# Altium PCB ePBR25_ACU_Power_rev0.PcbDoc (part 1 of 5)
Units mil, origin at the board's own origin, x right, y up, seen from the top; angles counter-clockwise.
Board outline 8211 x 3959 mil, 2 copper layers (Top Layer, Bottom Layer); 145 components, 129 nets, 544 pads, 1610 vias.
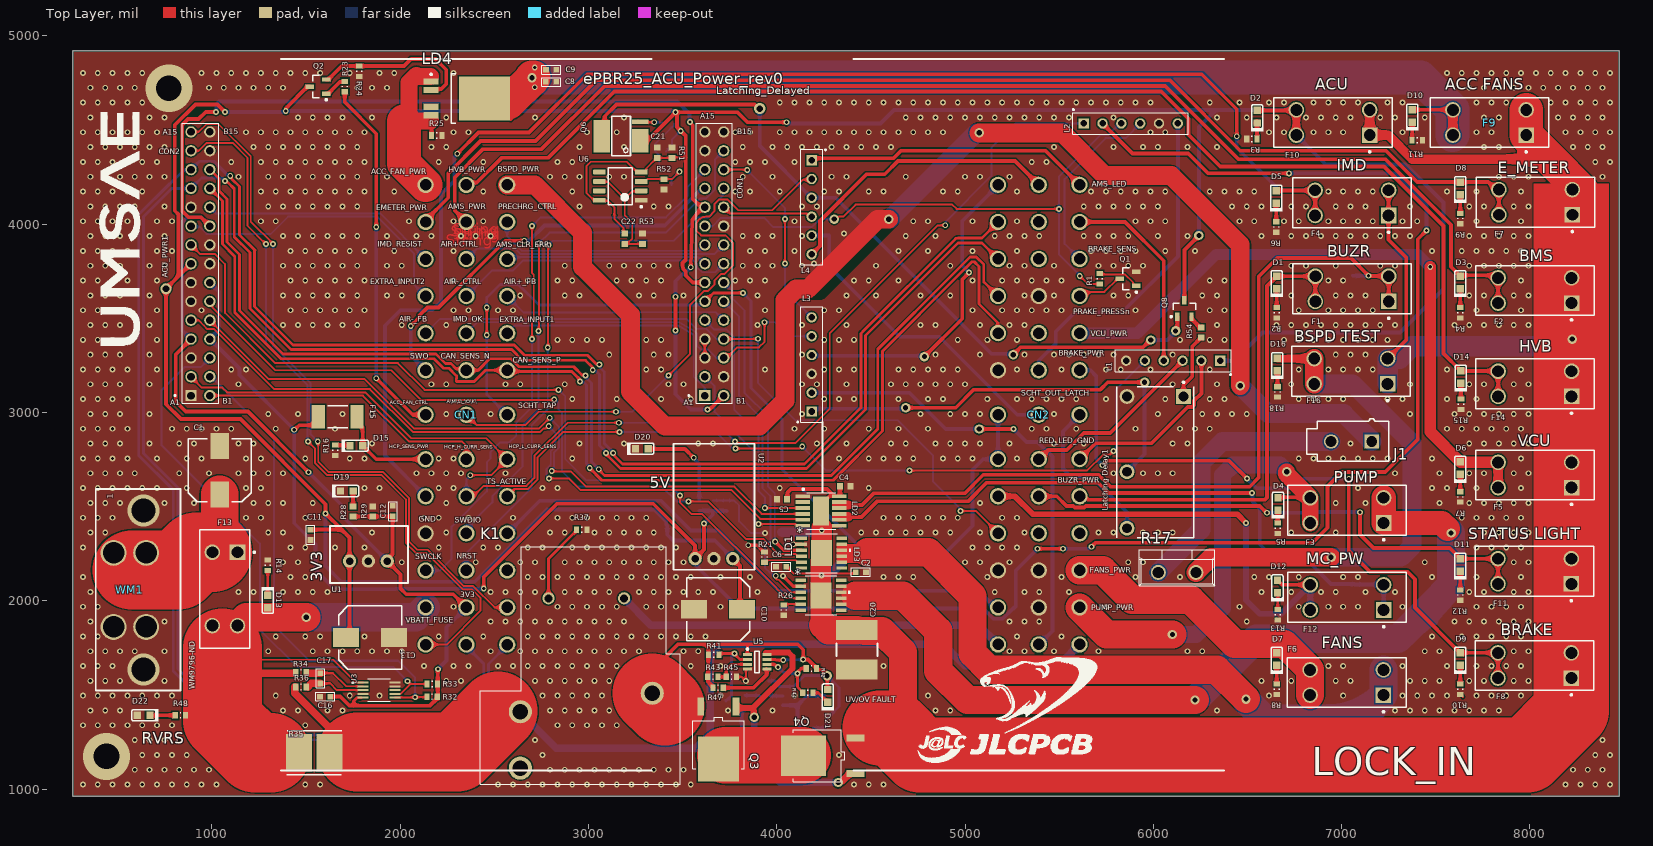
[diagram p0: Top Layer view]
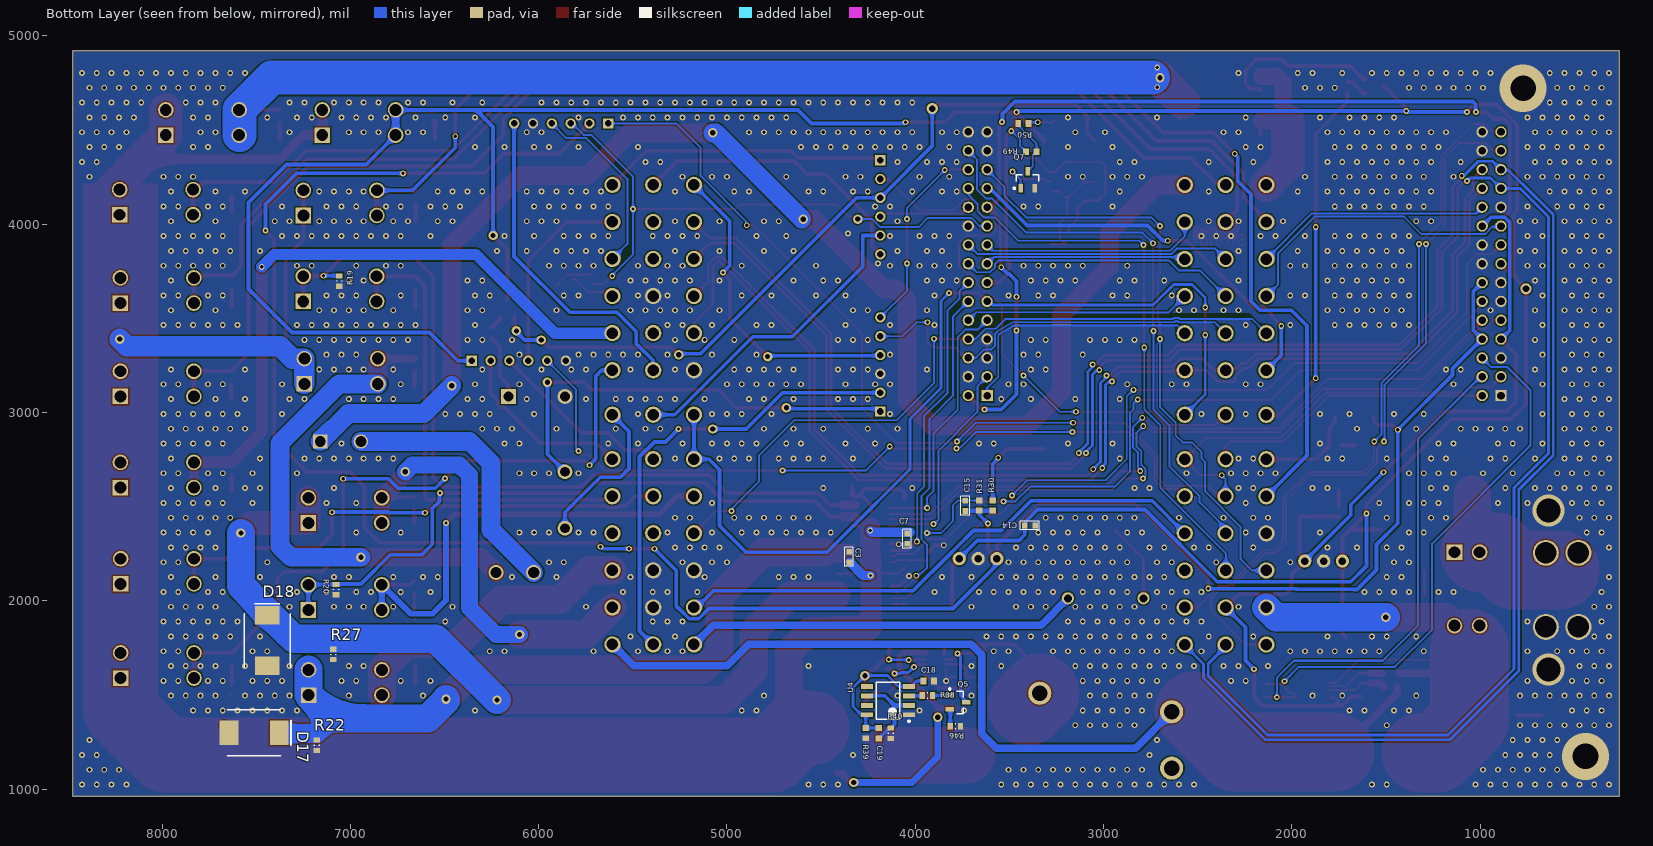
[diagram p1: Bottom Layer view, seen from below]

## Layer stack, top to bottom
Top Solder: solder mask 0.4, Solder Resist, Dk 3.5
Top Layer: signal copper 2.8
Dielectric 1: dielectric 12.6, FR-4, Dk 4.8
Bottom Layer: signal copper 2.8
Bottom Solder: solder mask 0.4, Solder Resist, Dk 3.5

## Board outline
262,961 8473,961 8473,4920 262,4920

## Design rules (kind name [scope] priority, off if disabled: settings)
Clearance "Stitching GND" [IsStitchingVia and InNet('GND') vs (IsVia and (Not IsStitchingVia)) Or IsPad] p1: gap=5 ignorepadtopadclearanceinfootprint=FALSE
Clearance [All] p2: gap=7 ignorepadtopadclearanceinfootprint=TRUE except(0: Arc-Hole Track-Hole SMDPad-Hole THPad-Hole Via-Hole Fill-Hole Poly-Hole Region-Hole Text-Hole)
ComponentClearance [All] p1: gap=0 collisioncheckmode=3 verticalgap=0 showdistances=FALSE
DiffPairsRouting [All] p1: maxlimit=10 minlimit=10 mostfreqgap=10 toplayer_minwidth=15 toplayer_maxwidth=15 toplayer_prefwidth=15 bottomlayer_minwidth=15 bottomlayer_maxwidth=15 bottomlayer_prefwidth=15 maxuncoupledlength=500
HoleSize [All] p1: absolutevalues=TRUE maxlimit=200 minlimit=10 maxpercent=80.000 minpercent=20.000
HoleToHoleClearance [All] p1: gap=8 allowstackedmicrovias=TRUE
MinimumAnnularRing MinimumAnnularRing_Pad [IsPad] p1: minimumring=7
MinimumAnnularRing MinimumAnnularRing_Via [IsVia] p2: minimumring=5
MinimumSolderMaskSliver [All] p1: minsoldermaskwidth=4
PlaneClearance [All] p1: clearance=15
PlaneConnect PlaneConnect_12V [InNet('12V')] p1: planeconnectstyle=Direct reliefexpansion=20 reliefentries=4 reliefconductorwidth=20 reliefairgap=10
PlaneConnect PlaneConnect_1 [All] p2: planeconnectstyle=Relief reliefexpansion=15 reliefentries=4 reliefconductorwidth=15 reliefairgap=10
PolygonConnect [All] p1: connectstyle=Direct reliefconductorwidth=15 reliefentries=4 polygonreliefangle="90 Angle" airgapwidth=10
RoutingVias [All] p1: holewidth=17 width=31 viastyle="Through Hole" minholewidth=15 minwidth=29 maxholewidth=50 maxwidth=100
SilkToSilkClearance [All] p1: silktosilkclearance=7
SilkToSolderMaskClearance [IsPad] p1: minsilkscreentomaskgap=2 clearancetoexposedcopper=TRUE
SolderMaskExpansion [All] p1: expansion=3 istentingtop=FALSE
SupplyNets "Schematic Supply Nets_5" [InNet('GLV')] p1: voltage=0.000
SupplyNets "Schematic Supply Nets_4" [InNet('3V3')] p2: voltage=0.000
SupplyNets "Schematic Supply Nets_3" [InNet('GND')] p3: voltage=0.000
SupplyNets "Schematic Supply Nets_2" [InNet('VS')] p4: voltage=0.000
SupplyNets "Schematic Supply Nets_1" [InNet('ACU_PWR')] p5: voltage=0.000
SupplyNets "Schematic Supply Nets" [InNet('5V')] p6: voltage=0.000
Width [All] p1: maxlimit=420 minlimit=7 preferedwidth=15
21 further rules are at their usual default settings.

## Classes and differential pairs
component class "1  - Connectors": CN1 CN2 CN3 CN4 CON1 CON2 L1 L2 L3 L4 Q1 R1 WM1 WM?
component class Designator: ACU_PWR1 C3 D1 D2 D3 D4 D5 D6 D7 D8 D9 D10 D11 D12 D13 D14 D15 D16 F1 F2 F3 F4 F5 F6 F7 F8 F9 F10 F11 F12 F13 F14 F15 F16 J1 R2 R3 R4 R5 R6 R7 R8 R9 R10 R11 R12 R13 R14 R15 R16 R17 R18
differential pair CAN: +CAN_P -CAN_N
differential pair CAN_SENS: +CAN_SENS_P -CAN_SENS_N

## Components (designator, comment, footprint, x,y, rotation, side; value= is the part's Value field where it differs from the comment)
ACU_PWR1 "Test Via" "Test Via" 756,3657 r270 top
C1 "UUD1H101MNL1GS" NIC-CAPA2-8X10_V 1041,2693 r90 top
C2 "Cap" 0603R-generic 4474,2152 r180 top value=10uF
C3 "Cap" 0603R-generic 4350.9,2260.49 r270 bottom value=10uF
C4 "Cap Semi" 1608[0603] 4363,2608 r180 top value=10uF
C5 "Cap Semi" 1608[0603] 4027.5,2540.06 r0 top value=10uF
C6 "Cap" 0603R-generic 3995.5,2180.68 r0 top value=10uF
C7 "Cap" 0603R-generic 4043,2302 r90 bottom value=10uF
C8 "Cap" 0603R-generic 2828.4,4756.01 r180 top value=10uF
C9 "Cap" 0603R-generic 2828.9,4820.51 r180 top value=10uF
C10 "UUD1H101MNL1GS" NIC-CAPA2-8X10_V 3688,1955 r180 top
C11 "Cap" 0603R-generic 1523.7,2322.84 r90 top value=10uF
C12 "Cap" 0603R-generic 1961,2504 r270 top value=10uF
C13 "UUD1H101MNL1GS" NIC-CAPA2-8X10_V 1840,1805 r0 top
C14 "Cap" 0603R-generic 3363,2400 r0 bottom value=10uF
C15 "Cap" 0603R-generic 3734,2532 r270 bottom value=10uF
C16 "Cap" 0603R-generic 1628.68,1491 r180 top value=0.1uF
C17 "Cap" 0603R-generic 1576,1561 r90 top value=0.1uF
C18 "Cap Semi" 1608[0603] 3927.58,1574.35 r0 bottom value=10uF
C19 "Cap Semi" 1608[0603] 4194,1297 r90 bottom value=10uF
C20 "Cap Semi" "2J-Lead 6.1 x 5.3" 4424,1737.29 r270 top value=33uF
C21 "Cap Semi" 1608[0603] 3365.21,4379.85 r270 top value=10uF
C22 "Cap Semi" 1608[0603] 3192,3923 r90 top value=15uF
CN1 "5-1418363-1" "LeavySeal 39 pin Ver" 2351.54,2988 r90 top
CN2 "5-1418363-1" "LeavySeal 39 pin Ver" 5391.46,2988.38 r90 top
CON1 "6-534998-3" *TE_6-146257-5 3719,3690 r90 top
CON2 "6-534998-3" *TE_6-146257-5 989.98,3690 r90 top
D1 "KP-1608MGC" KING-0603LED_GREEN_V 6655,3690 r90 top
D2 "KP-1608MGC" KING-0603LED_GREEN_V 6551,4571 r90 top
D3 "KP-1608MGC" KING-0603LED_GREEN_V 7630,3690 r90 top
D4 "KP-1608MGC" KING-0603LED_GREEN_V 6662,2514.5 r90 top
D5 "KP-1608MGC" KING-0603LED_GREEN_V 6652,4145 r90 top
D6 "KP-1608MGC" KING-0603LED_GREEN_V 7630,2704.47 r90 top
D7 "KP-1608MGC" KING-0603LED_GREEN_V 6655,1690 r90 top
D8 "KP-1608MGC" KING-0603LED_GREEN_V 7630,4190 r90 top
D9 "KP-1608MGC" KING-0603LED_GREEN_V 7630,1690 r90 top
D10 "KP-1608MGC" KING-0603LED_GREEN_V 7374.9,4574.77 r90 top
D11 "KP-1608MGC" KING-0603LED_GREEN_V 7630,2190 r90 top
D12 "KP-1608MGC" KING-0603LED_GREEN_V 6659,2075 r90 top
D13 "KP-1608MGC" KING-0603LED_GREEN_V 1297,1996 r270 top
D14 "KP-1608MGC" KING-0603LED_GREEN_V 7632,3188 r90 top
D15 "KP-1608MGC" KING-0603LED_GREEN_V 1767,2824.09 r0 top
D16 "KP-1608MGC" KING-0603LED_GREEN_V 6658,3254.93 r90 top
D17 "S8MC-13" S8MC-13 7511,1299 r180 bottom
D18 "S8MC-13" S8MC-13 7441,1789 r90 bottom
D19 "KP-1608MGC" KING-0603LED_GREEN_V 1716.47,2583 r0 top
D20 "KP-1608MGC" KING-0603LED_GREEN_V 3283,2808 r0 top
D21 "UVOV FAULT" TOSH-0603LED_RED_V 4270.9,1495.16 r90 top
D22 "RVRS POLARITY" TOSH-0603LED_RED_V 637.77,1391.5 r180 top
F1 "36-3568-ND" KSTN-3568_V 7055,3656.53 r180 top
F2 "36-3568-ND" KSTN-3568_V 8025.88,3647.93 r180 top
F3 "36-3568-ND" KSTN-3568_V 7028,2480 r180 top
F4 "36-3568-ND" KSTN-3568_V 7054,4113 r180 top
F5 "36-3568-ND" KSTN-3568_V 8026,2668 r180 top
F6 "36-3568-ND" KSTN-3568_V 7027,1566.22 r180 top
F7 "36-3568-ND" KSTN-3568_V 8030,4116.93 r180 top
F8 "36-3568-ND" KSTN-3568_V 8025,1656.54 r180 top
F9 "36-3568-ND" KSTN-3568_V 7785.12,4539.93 r180 top
F10 "36-3568-ND" KSTN-3568_V 6954,4540 r180 top
F11 "36-3568-ND" KSTN-3568_V 8025,2156.53 r180 top
F12 "36-3568-ND" KSTN-3568_V 7028,2017.93 r180 top
F13 "36-3568-ND" KSTN-3568_V 1069.07,2062.88 r270 top
F14 "36-3568-ND" KSTN-3568_V 8026,3152 r180 top
F15 "1812L050PR" LFUS-1812L050_V 1667.4,2977.95 r0 top
F16 "36-3568-ND" KSTN-3568_V 7049,3219 r180 top
J1 "39-28-1023" MOLX-39-28-1023-2_V 7052,2846 r270 top
K1 "J115F11C12VDCSH.9" RELAY_J115F11C12VDCSH.9 2956.74,1655.72 r180 top
L1 "6 Pin Header" 5-146285-6 6155,3275 r180 top
L2 "6 Pin Header" 5-146285-6 5830,4535 r0 top
L3 "6 Pin Header" 5-146285-6 4185,3205 r90 top
L4 "6 Pin Header" 5-146285-6 4185,4140 r270 top
"Latching Delay1" "ALQ3F12" FP-ALQ3F12-MFG 6010,2735 r270 top
LD1 "VN5E050AJTR-E" SO_050AJ-E_STM 4237.75,2252.74 r0 top
LD2 "LD - VND5E050JTR-E" VND5E050JTR-E 4235,2477 r0 top
LD3 "VN5E050AJTR-E" SO_050AJ-E_STM 4234.75,2029.24 r0 top
LD4 "BTS6142D" INF-PG-TO252-5-11_M 2353,4668 r0 top
Q1 "" SOT-23_N 5865,3710 r180 top
Q2 "" SOT-23_N 1563,4731 r180 top
Q3 "MCU80N03A-TP" MCU80N_MCE 3690,1235 r180 top
Q4 "MCU80N03A-TP" MCU80N_MCE 4215.14,1176.95 r90 top
Q5 "" SOT-23_N 3772,1460.38 r180 bottom
Q6 "FDS6675" SO08-E3 3173,4468 r90 top
Q7 "" SOT-23_N 3403,4235.71 r90 bottom
Q8 "" SOT-23_N 6164.92,3552.85 r90 top
R1 "1k" RESC0603(1608)_L 5715,3710 r90 top
R2 "560" RESC0603(1608)_L 6655,3530 r270 top
R3 "560" RESC0603(1608)_L 6523,4452 r180 top
R4 "560" RESC0603(1608)_L 7630,3530 r270 top
R5 "560" RESC0603(1608)_L 6660,2385 r270 top
R6 "560" RESC0603(1608)_L 6652,3985 r270 top
R7 "560" RESC0603(1608)_L 7630,2551.63 r270 top
R8 "560" RESC0603(1608)_L 6655,1530 r270 top
R9 "560" RESC0603(1608)_L 7630,4030 r270 top
R10 "560" RESC0603(1608)_L 7630,1530 r270 top
R11 "560" RESC0603(1608)_L 7401,4445 r0 top
R12 "560" RESC0603(1608)_L 7630,2030 r270 top
R13 "560" RESC0603(1608)_L 6661,1926 r270 top
R14 "560" RESC0603(1608)_L 1295.77,2188.79 r90 top
R15 "560" RESC0603(1608)_L 7634,3044 r270 top
R16 "560" RESC0603(1608)_L 1654.38,2798.96 r270 top
R17 "5.6R" TO220AC 6025.99,2150.41 r0 top
R18 "560" RESC0603(1608)_L 6659,3109 r270 top
R19 "10K" RESC0603(1608)_L 7058,3698 r270 bottom
R20 "10K" RESC0603(1608)_L 7075.87,2059.53 r270 bottom
R21 "10K" RESC0603(1608)_L 3935,2232 r270 top
R22 "10K" RESC0603(1608)_L 7179,1232.44 r90 bottom
R23 "1K" RESC0603(1608)_L 1706,4731 r90 top
R24 "10K" RESC0603(1608)_L 1783,4812 r270 top
R25 "10K" RESC0603(1608)_L 2193.97,4471 r0 top
R26 "10K" RESC0603(1608)_L 4037,1950.5 r90 top
R27 "10K" RESC0603(1608)_L 7090,1715 r90 bottom
R28 "Res1" 1608[0603] 1749,2474 r90 top value=82R
R29 "Res1" 1608[0603] 1855,2474 r270 top value=100
R30 "Res1" 1608[0603] 3589,2506 r90 bottom value=180R
R31 "Res1" 1608[0603] 3660,2506 r270 bottom value=100
R32 "2.2k" RESC0603(1608)_L 2169,1491 r0 top
R33 "2.2k" RESC0603(1608)_L 2170,1558 r0 top
R34 "5" RESC0603(1608)_L 1473,1619 r180 top
R35 "WSHP28182L000FEB" FP-WSHP2818-MFG 1543,1193 r180 top
R36 "5" RESC0603(1608)_L 1473,1542 r180 top
R37 "100" RESC0603(1608)_L 2964.53,2377 r0 top
R38 "10K" RESC0603(1608)_L 3935,1497.11 r180 bottom
R39 "Res1" 1608[0603] 4262.25,1297.39 r90 bottom value=10K
R40 "1000K" RESC0603(1608)_L 4130.5,1296.59 r90 bottom
R41 "21K" RESC0603(1608)_L 3665.27,1713.95 r0 top
R42 "10K" RESC0603(1608)_L 4183.69,1640.71 r180 top
R43 "32K" RESC0603(1608)_L 3660.87,1595.81 r180 top
R44 "560" RESC0603(1608)_L 4164.99,1510.89 r0 top
R45 "1K" RESC0603(1608)_L 3759,1596 r180 top
R46 "1K" RESC0603(1608)_L 3786.56,1332.93 r180 bottom
R47 "510K" RESC0603(1608)_L 3688,1538 r0 top
R48 "560" RESC0603(1608)_L 832.77,1391.5 r180 top
R49 "Res1" 1608[0603] 3383.91,4385.42 r0 bottom value=10K
R50 "Res1" 1608[0603] 3425,4535 r180 bottom value=100
R51 "" 1608[0603] 3443.7,4379.85 r270 top value=10K
R52 "Res1" 1608[0603] 3401,4211 r90 top value=10K
R53 "Res1" 1608[0603] 3286.89,3923 r270 top value=1000K
R54 "Res1" 1608[0603] 6253.57,3424.87 r270 top value=1k
U1 "Volt Reg" DCDC_VERTICAL 1831,2211 r180 top
U2 "Volt Reg" DCDC_HORIZONTAL 3666,2224 r0 top
U3 "INA230" SOP50P490X110-10N 1886.33,1611.71 r0 top
U4 "NE555DR" D0008A_M 4144.19,1469.56 r0 bottom
U5 "LTC4365ITS8#TRMPBF" LT-TS8-8-TSOT-23_V 3895.6,1675.56 r0 top
U6 "NE555DR" D0008A_M 3168.78,4202 r180 top
WM1 "WM9796-ND" WM9796-ND 477.77,2057.85 r90 top

## Footprints (in the part's own frame and the unit in brackets; to place one, negate y for a bottom-side part, rotate by r counter-clockwise, add the part's x,y. Pads: shape width x height; smd on the part's side, far side on the other; paste and mask are expansions set on the pad)
"2J-Lead 6.1 x 5.3" [mm]
  rect 2.7x5.6 smd: 1(-2.7,0) 2(2.6,0)
  silkscreen extent -0.9,-2.7 0.8,2.8, body extent -3.4,-2.8 3.3,2.8, height 5
5-146285-6 [mm] "6-pin Header"
  rect 1.398x1.398 hole 0.89: 1(-5.08,0)
  round 1.398 hole 0.89: 2(-2.54,0) 3(0,0) 4(2.54,0) 5(5.08,0) 6(7.62,0)
  silkscreen extent -6.58,-1.47 9.05,1.97, body extent -6.37,-1.27 8.87,1.27, height 9.5
0603R-generic [mil] "RESISTOR 0603"
  rect 30x30 smd: 1(0,0) 2(55,0)
  silkscreen extent -23,-23 78,23, body extent -4,-15 59,15, height 19
1608[0603] [mm] "Chip Capacitor, Body 1.6x0.8mm, IPC High Density"
  rect 0.8x0.9 smd: 1(-0.7,0) 2(0.7,0)
  body extent -0.87,-0.48 0.87,0.48, height 1.3
*TE_6-146257-5 [mm] "HEADER VERT 30POS"
  rect 1.53x1.53 hole 1.02: A1(-15.24,2.565)
  round 1.53 hole 1.02: A2(-12.7,2.565) A3(-10.16,2.565) A4(-7.62,2.565) A5(-5.08,2.565) A6(-2.54,2.565) A7(0,2.565) A8(2.54,2.565) A9(5.08,2.565) A10(7.62,2.565) A11(10.16,2.565) A12(12.7,2.565) A13(15.24,2.565) A14(17.78,2.565) A15(20.32,2.565) B1(-15.24,0.025) B2(-12.7,0.025) B3(-10.16,0.025) B4(-7.62,0.025) B5(-5.08,0.025) B6(-2.54,0.025) B7(0,0.025) B8(2.54,0.025) B9(5.08,0.025) B10(7.62,0.025) B11(10.16,0.025) B12(12.7,0.025) B13(15.24,0.025) B14(17.78,0.025) B15(20.32,0.025)
  silkscreen extent -16.31,-1.14 21.47,4.83, body extent -16.48,-1.29 21.62,3.79, height 8.67
D0008A_M [mm] "SOIC, 8-Leads, Body 5x4mm, Pitch 1.27mm, IPC Low Density"
  rrect15% 1.65x0.65 smd: 1(-2.825,1.905) 2(-2.825,0.635) 3(-2.825,-0.635) 4(-2.825,-1.905) 5(2.825,-1.905) 6(2.825,-0.635) 7(2.825,0.635) 8(2.825,1.905)
  silkscreen extent -2.95,-2.5 1.6,2.9, body extent -3,-2.45 3,2.45, height 1.63
DCDC_HORIZONTAL [mm]
  round 1.8 hole 1: 1(2.54,0) 2(0,0) 3(-2.54,0)
  silkscreen extent -5.45,-1.5 5.45,15.5, body extent -5.23,-1.29 5.18,15.22, height 7.75
DCDC_VERTICAL [mm]
  round 1.8 hole 1: 1(2.54,0) 2(0,0) 3(-2.54,0)
  silkscreen extent -5.33,-4.75 5.2,2.98, body extent -5.28,-4.87 5.14,2.87, height 17.18
FP-ALQ3F12-MFG [mm]
  rect 2x2 hole 1.3 paste-2539.97 mask+0: 1(-8.89,3.81)
  round 2 hole 1.3 paste-2539.97 mask+0: 2(-8.89,-3.81) 3(1.27,-3.81) 4(8.89,-3.81)
  silkscreen extent -10.92,-5.2 10.2,5.2, body extent -10.3,-5.3 10.3,5.3, height 0.25
FP-WSHP2818-MFG [mm]
  rect 3.5x5.1 smd paste+0 mask+0: 1(-2.055,0) 2(2.055,0)
  silkscreen extent -3.69,-2.94 3.67,2.95, body extent -3.91,-2.65 3.91,2.65, height 0.25
INF-PG-TO252-5-11_M [mm] "DPAK, 5-Leads, Body 6.5x6.12mm, Pitch 1.14mm, IPC Low Density"
  rect 2.05x0.85 smd: 1(-4.8,2.28) 2(-4.8,1.14) 4(-4.8,-1.14) 5(-4.8,-2.28)
  rect 6.9x5.95 smd: 3(2.4,0)
  silkscreen extent -4.92,-3.35 -1.45,3.38, body extent -2.05,-3.32 4.17,3.32, height 2.35
KING-0603LED_GREEN_V [mm] "SMT LED, 2-Leads, Body 1.6x0.8mm (0603-Size)"
  rect 1x1 smd paste+0 mask+0: 1(0.85,0) 2(-0.85,0)
  silkscreen extent -1.97,-0.85 1.6,0.85, body extent -0.92,-0.53 1.09,0.53, height 1.1
KSTN-3568_V [mm] "THD, 4-Leads, Body 16x6.73mm, Pitch 9.9mm"
  rect 2.1x2.1 hole 1.6: 1(-4.95,1.7)
  round 2.1 hole 1.6: 2(-4.95,-1.7) 3(4.95,1.7) 4(4.95,-1.7)
  silkscreen extent -8,-3.36 8,4.09, body extent -8,-3.37 8,3.37, height 7.44
"LeavySeal 39 pin Ver" [mm] "Levyseal 90 degree 39 pin header 5-1418363-3"
  round 2.2 hole 1.55: 1(31,-5.5) 2(31,0) 3(31,5.5) 4(26,-5.5) 5(26,0) 6(26,5.5) 7(21,-5.5) 8(21,0) 9(21,5.5) 10(16,-5.5) 11(16,0) 12(16,5.5) 13(11,-5.5) 14(11,0) 15(11,5.5) 16(6,-5.5) 17(6,0) 18(6,5.5) 19(0,-5.5) 20(0,0) 21(0,5.5) 22(-6,-5.5) 23(-6,0) 24(-6,5.5) 25(-11,-5.5) 26(-11,0) 27(-11,5.5) 28(-16,-5.5) 29(-16,0) 30(-16,5.5) 31(-21,-5.5) 32(-21,0) 33(-21,5.5) 34(-26,-5.5) 35(-26,0) 36(-26,5.5) 37(-31,-5.5) 38(-31,0) 39(-31,5.5)
  silkscreen extent -48,-25 48,25, body extent -66,-24 66,24, height 9.5
LFUS-1812L050_V [mm] "Chip Fuse, 2-Leads, Body 4.73x3.41mm"
  rect 1.78x3.15 smd: 1(-2.615,0) 2(2.615,0)
  silkscreen extent -1.35,-1.47 1.35,1.47, body extent -2.36,-1.7 2.36,1.7, height 0.75
LT-TS8-8-TSOT-23_V [mm] "SOT23, 8-Leads, Body 2.9x1.75mm, Pitch 0.65mm"
  rect 1.22x0.4 smd: 1(-1.31,0.975) 2(-1.31,0.325) 3(-1.31,-0.325) 4(-1.31,-0.975) 5(1.31,-0.975) 6(1.31,-0.325) 7(1.31,0.325) 8(1.31,0.975)
  silkscreen extent -1.43,-1.45 0.3,1.85, body extent -0.87,-1.45 0.88,1.45, height 1
MCU80N_MCE [mil]
  rect 36x95 smd: 1(-94,-202.5) 2(94,-202.5)
  rect 217x239 smd: 3(0,74.5)
  silkscreen extent -137,-147 137,127
MOLX-39-28-1023-2_V [mm] "THD, 2-Leads, Body 11x5.8mm"
  rect 1.95x1.95 hole 1.45: 1(0,2.75)
  round 1.95 hole 1.45: 2(0,-2.75)
  silkscreen extent -3.1,-6 2.7,5, body extent -3.1,-6 2.7,5, height 13.6
NIC-CAPA2-8X10_V [mm] "Aluminum Electrolytic Capacitor, Diameter 8mm, Height 10.8mm, Pitch 6.5mm"
  rect 3.5x2.5 smd: 1(-3.25,0) 2(3.25,0)
  silkscreen extent -4.25,-4.25 4.25,4.25, body extent -3.99,-3.97 3.99,4, height 10.8
RELAY_J115F11C12VDCSH.9 [mm]
  round 1.65 hole 1.1: A1(-5.9,-9.075) A2(4.3,-9.075)
  round 3.116 hole 2.1: COM(-9.7,3.725) NC(8.1,13.825) NO(8.1,6.225)
  silkscreen extent -13.5,-16.02 13.5,16.02, body extent -13.5,-16.03 13.5,16.02, height 20
RESC0603(1608)_L [mm]
  rect 0.7x0.9 smd: 1(-0.7,0) 2(0.7,0)
  silkscreen extent -0.05,-0.35 0.05,0.35, body extent -0.85,-0.47 0.85,0.47, height 0.6
S8MC-13 [mil]
  rect 100x130 smd: 1(-133.86,0) 2(133.86,0)
  silkscreen extent -142,-122 195,122
SO08-E3 [mm]
  rect 3.15x2.2 smd mask+0: 1-3(-0.635,-2.6)
  rect 0.6x2.2 smd: 4(1.905,-2.6)
  rect 4.4x2.2 smd mask+0: 5-8(0,2.6)
  silkscreen extent -2.67,-1.27 2.67,1.27
SO_050AJ-E_STM [mil]
  rect 57.5x18 smd paste+0 mask+0: 1(-107.25,78.74) 2(-107.25,47.24) 3(-107.25,15.75) 4(-107.25,-15.75) 5(-107.25,-47.24) 6(-107.25,-78.74) 7(107.25,-78.74) 8(107.25,-47.24) 9(107.25,-15.75) 10(107.25,15.75) 11(107.25,47.24) 12(107.25,78.74)
  rect 110x138 smd paste-68.5 mask+0: EPAD(0,0)
  silkscreen extent -84,-104 156,104, body extent -122,-99 122,99, height 64
SOP50P490X110-10N [mm]
  rrect25% 1.47x0.28 smd: 1(-2.124,-1.185) 2(-2.124,-1.685) 3(-2.124,-2.185) 4(-2.124,-2.685) 5(-2.124,-3.185) 6(2.176,-3.185) 7(2.176,-2.685) 8(2.176,-2.185) 9(2.176,-1.685) 10(2.176,-1.185)
  silkscreen extent -3.57,-3.69 1.53,-0.69, body extent -2.42,-3.69 2.48,-0.69, height 1.1
SOT-23_N [mm] "SOT23, 3-Leads, Body 2.9x1.3mm, Pitch 0.95mm, Lead Span 2.5mm, IPC Medium Density"
  rect 1.15x0.6 smd: 1(-1.125,0.95) 2(-1.125,-0.95) 3(1.125,0)
  silkscreen extent -1.25,-1.5 0.7,1.92, body extent -0.7,-1.5 0.7,1.5, height 1.1
"Test Via" [mm] "Test Via Hole"
  round 1.5 hole 0.9: 1(0,0)
TO220AC [mil]
  round 80 hole 60: 1(200,0) 2(0,0)
  silkscreen extent -100,-70 300,120, body extent -100,-70 300,120, height 920
TOSH-0603LED_RED_V [mm] "SMT LED, 2-Leads, Body 1.6x0.8mm (0603-Size)"
  rect 1x1 smd paste+0 mask+0: 1(0.85,0) 2(-0.85,0)
  silkscreen extent -1.97,-0.85 1.6,0.85, body extent -0.92,-0.53 1.09,0.53, height 0.6
VND5E050JTR-E [mm]
  rect 1.97x0.5 smd: 1(-2.475,2) 2(-2.475,1.2) 3(-2.475,0.4) 4(-2.475,-0.4) 5(-2.475,-1.2) 6(-2.475,-2) 7(2.475,-2) 8(2.475,-1.2) 9(2.475,-0.4) 10(2.475,0.4) 11(2.475,1.2) 12(2.475,2)
  rect 2.2x3.9 smd: 13(0,0)
  silkscreen extent -2.54,-2.45 1.95,3.05
WM9796-ND [mm]
  round 3.5 hole 2.9: 1(5,-4.4) 1(5,0) 2(-5,-4.4) 2(-5,0)
  silkscreen extent -13.59,-9.02 13.59,2.41, body extent -11.78,-9.51 12.04,4.59, height 21.3

## Part data
ACU_PWR1: library part "Test VIa"
C1 C10 C13: library part CMP-0687-00073-1, "Aluminum Electrolytic Capacitor, UD Series, Low Impedance, 100 uF, 50 V, + / - 20%, -55 to 105 degC, Chip Type, 8 x 10 mm D x L, Pb-Free, Reel", Capacitance=100µF, ESR (Equivalent Series Resistance)=-, Lifetime @ Temp.="5000 Hrs @ 105°C", Manufacturer=Nichicon, Operating Temperature="-55°C ~ 105°C", Package / Case="Radial, Can - SMD", Rated Capacitance="100 uF", Rated Ripple Current (at 100kHz)="300 mA", Rated Voltage="50 V", Ripple Current=300mA, Supplier Part Number 1=493-2306-1-ND, Tolerance=±20%, Tolerance Rated Capacitance="-20 to 20%", Voltage Rating=50V, Applications="General Purpose", Category=Capacitors, ComponentLink1Description="Manufacturer URL", ComponentLink1URL=http://www.nichicon.co.jp/, ComponentLink2Description=Datasheet, ComponentLink2URL=http://products.nichicon.co.jp/en/pdf/XJA043/e-ud.pdf, ComponentLink3Description="Package Specification", ComponentLink3URL=http://products.nichicon.co.jp/en/pdf/XJA043/e-ud.pdf, ComponentLink4Description=http://nichicon-us.com/english/products/pdfs/e-uud.pdf, ComponentLink4URL=http://nichicon-us.com/english/products/pdfs/e-uud.pdf, DatasheetVersion=08/2012, Diameter="8 mm", Endurance Time="5000 h", Height - Seated (Max)="0.394\" (10.00mm)", Impedance="0.34 Ohm", Lead Spacing=-, Length="10 mm", Manufacturer Part Number=UUD1H101MNL1GS, Mounting Technology="Surface Mount", Mounting Type="Surface Mount", PackageDescription="2-Pin Surface Mount Device, Diameter 8 mm, Height 10 mm, Pitch 6.5 mm", PackageReference=CAPAE-D8H10, Packaging="Cut Tape (CT)", Packing="Dia382mm Reel", Part Status=Active, PartNumber=UUD1H101MNL1GS, Polarization=Polar, Pricing 1="1=0.92, 10=0.685, 25=0.5868, 50=0.5478, 100=0.4696, 250=0.43044 (CAD)", RoHS=TRUE, Size / Dimension="0.315\" Dia (8.00mm)", Stock 1=65948, Supplier 1=Digi-Key, Surface Mount Land Size="0.327\" L x 0.327\" W (8.30mm x 8.30mm)"
C2 C3 C6 C7 C8 C9 C11 C12 C14 C15 C16 C17: "Capacitor", Capacitance=10µF, Manufacturer=Yageo, Manufacturer Part Number=CC1210ZKY5V8BB106, Operating Temperature="-30°C ~ 85°C", Package / Case="1210 (3225 Metric)", Ratings=-, Supplier Part Number 1=311-2063-1-ND, Temperature Coefficient="Y5V (F)", Tolerance="-20%, +80%", Voltage - Rated=25V, Applications="General Purpose", Category=Capacitors, ComponentLink1Description=http://www.yageo.com/documents/recent/UPY-GPHC_Y5V_6.3V-to-50V_7.pdf, ComponentLink1URL=http://www.yageo.com/documents/recent/UPY-GPHC_Y5V_6.3V-to-50V_7.pdf, Failure Rate=-, Features=-, Height - Seated (Max)=-, Lead Spacing=-, Lead Style=-, Mounting Type="Surface Mount, MLCC", Packaging="Cut Tape (CT)", Part Status=Active, Pricing 1="1=0.47, 10=0.323, 25=0.258, 50=0.2154, 100=0.1829, 250=0.14528, 500=0.12912, 1000=0.11298 (CAD)", RoHS="RoHS Compliant", Size / Dimension="0.126\" L x 0.098\" W (3.20mm x 2.50mm)", Stock 1=1156, Supplier 1=Digi-Key, Supplier 2=Digi-Key, Supplier Part Number 2=1276-1869-1-ND, Thickness (Max)="0.083\" (2.10mm)"
C4 C5 C18 C19 C21 C22: "Capacitor (Semiconductor SIM Model)", Supplier Part Number 1=490-10991-1-ND, LatestRevisionDate=29-May-2009, LatestRevisionNote="IPC-7351 Footprint Added.", PackageDescription="Chip Capacitor", PackageReference=C1206, Published=8-Jun-2000, Publisher="Altium Limited", Supplier 1=Digi-Key
C20: "Capacitor (Semiconductor SIM Model)", Supplier Part Number 1=490-5834-1-ND, LatestRevisionDate=29-May-2009, LatestRevisionNote="IPC-7351 Footprint Added.", PackageDescription="Chip Capacitor", PackageReference=C1206, Published=8-Jun-2000, Publisher="Altium Limited", Supplier 1=Digi-Key
CN1 CN2: library part 5-1418363-3, "Levyseal Vertical 39 pin header"
CON1 CON2: Supplier Part Number 1=S7118-ND, Built_By=EMA_UL_Team, C="Copyright (C) 2015 Accelerated Designs. All rights reserved", Manufacturer_Part_Number=6-534998-3, Supplier 1=Digi-Key, Vendor="TE Connectivity"
D1 D4 D6 D7 D9 D11 D15 D16: library part CMP-0404-00001-1, "LED, SMT, 0603(1608), 1.1mm thickness, Green", Forward Current="30 mA", Manufacturer=Kingbright, Power Dissipation="75 mW", Reverse Voltage="5 V", Storage Temperature="-40 to +85 degC", Supplier Part Number 1=732-4980-1-ND, ComponentLink1Description="Manufacturer URL", ComponentLink1URL=http://www.kingbright.com/, Mounting Technology="Surface Mount", PackageDescription="2-Pin SMT LED, 1.6 x 0.8 mm Pitch", PackageReference=0603LED_GREEN, Packing Type="2000 pcs / reel", PartNumber=KP-1608MGC, Supplier 1=Digi-Key
D2 D3 D5 D8 D10 D12 D13 D14: library part CMP-0404-00001-1, "LED, SMT, 0603(1608), 1.1mm thickness, Green", Forward Current="30 mA", Manufacturer=Kingbright, Power Dissipation="75 mW", Reverse Voltage="5 V", Storage Temperature="-40 to +85 degC", Supplier Part Number 1=160-1437-1-ND, ComponentLink1Description="Manufacturer URL", ComponentLink1URL=http://www.kingbright.com/, Mounting Technology="Surface Mount", PackageDescription="2-Pin SMT LED, 1.6 x 0.8 mm Pitch", PackageReference=0603LED_GREEN, Packing Type="2000 pcs / reel", PartNumber=KP-1608MGC, Supplier 1=Digi-Key
D17 D18: library part Diode, "Default Diode", Supplier Part Number 1=S8MCDICT-ND, Supplier 1=Digi-Key
D19 D20: library part CMP-0404-00001-1, "LED, SMT, 0603(1608), 1.1mm thickness, Green", Forward Current="30 mA", Manufacturer=Kingbright, Power Dissipation="75 mW", Reverse Voltage="5 V", Storage Temperature="-40 to +85 degC", Supplier Part Number 1=475-2815-1-ND, ComponentLink1Description="Manufacturer URL", ComponentLink1URL=http://www.kingbright.com/, Mounting Technology="Surface Mount", PackageDescription="2-Pin SMT LED, 1.6 x 0.8 mm Pitch", PackageReference=0603LED_GREEN, Packing Type="2000 pcs / reel", PartNumber=KP-1608MGC, Supplier 1=Digi-Key
D21 D22: library part CMP-0444-00001-1, "LED, Red 0603 (1608) 63mCd", Forward Current="25 mA", Manufacturer=Toshiba, PartNumber=TLSU1008A(T04), Power Dissipation="60 mW", Reverse Voltage="4 V", Storage Temperature="-40 to 100 degC", Supplier Part Number 1=475-2512-1-ND, ComponentLink1Description="Manufacturer URL", ComponentLink1URL=http://www.toshiba-components.com/, ComponentLink2Description=Datasheet, ComponentLink2URL=http://www.semicon.toshiba.co.jp/info/docget.jsp?type=datasheet&lang=en&pid=TLSU1008A(T04), DatasheetVersion=Aug-08, Mounting Technology="Surface Mount", PackageDescription="2-Pin SMT LED, 1.6 x 0.8 mm Pitch", PackageReference=0603LED_RED, Packing Type=Reel, Supplier 1=Digi-Key
F1 F2 F3 F4 F5 F7 F8 F9 F10 F11 F12 F13 F14 F16: library part CMP-2000-05464-1, "Fuse Holder, 20 A, 500 V, -50 to 145 degC, 4-Pin THD, RoHS", Manufacturer=Keystone, Package Description="4-Pin Through Hole Device, Body 16 x 6.73 mm, Pitch 9.9 mm", Package Reference=3568, Datasheet URL=https://datasheet.ciiva.com/16294/m60-2p40-16294706.pdf, Datasheet Version=04/2013, Manufacturer URL=http://www.keyelco.com/, Mounting Technology=ThroughHole
F6: library part CMP-2000-05464-1, Manufacturer=Keystone, Package Description="4-Pin Through Hole Device, Body 16 x 6.73 mm, Pitch 9.9 mm", Package Reference=3568, Datasheet URL=https://datasheet.ciiva.com/16294/m60-2p40-16294706.pdf, Datasheet Version=04/2013, Manufacturer URL=http://www.keyelco.com/, Mounting Technology=ThroughHole
F15: library part CMP-1700-00002-1, "POLY-FUSE(R) Resettable PTC, 0.5 A, 0.15 to 1 Ohm Resistance, -40 to 85 degC, 1812 (4532 Metric), RoHS, Tape and Reel", Case\Package=0603, Case Code (Metric)=1608, Max Operating Temperature="155 degC", Min Operating Temperature="-55 degC", Package Quantity=1, Power Rating="100 mW", Resistance="150 kohm", Supplier Part Number 1=F2150CT-ND, Tolerance=1%, Voltage Rating="50 V", Case Code (Imperial)=0603, ComponentLink1Description="Manufacturer URL", ComponentLink1URL=http://www.littelfuse.com/, ComponentLink2Description=Datasheet, ComponentLink2URL=http://www.littelfuse.com/~/media/electronics/datasheets/resettable_ptcs/littelfuse_ptc_1812l_datasheet.pdf.pdf, DatasheetVersion=Feb-16, Height="0.45 mm", Length="1.6 mm", Mount="Surface Mount", PackageDescription="2-Pin Surface Mount Device, Body 4.55 x 3.24 mm", PackageReference=1812, Packaging="Tape and Reel", Pins=2, REACH SVHC="No SVHC", RoHSCompliant=true, Supplier 1=Digi-Key, Voltage Rating (DC)="50 V", Width="0.8 mm"
J1: library part CMP-2000-05244-1, "Female Header, Pitch 4.2 mm, 1 x 2 Position, Height 12.8 mm, Tail Length 3.5 mm, -40 to 105 degC, RoHS", Colour=Clear, Current Rating=13A, Flammability Rating=UL94V-2, Manufacturer=Molex, Voltage Rating V AC=600V, Working Voltage=250V, Connector Body Material=–, Connector Insert Type=Header, Connector Mounting=PCB, Connector Mounting Orientation=PCB, Connector Type=RectangularPower, Contact Gender=–, Contact Material=Brass, Contact Plating=Tin, Contact Termination=Solder, Datasheet URL=https://datasheet.ciiva.com/11746/0900766b80460d9e-11746456.pdf, Datasheet Version="Rev. F, 05/2004", Gender=Header, Lead Spacing=4.2mm, Manufacturer URL=http://www.molex.com/, Mounting Orientation=Straight, Mounting Type=PCBoard, MSL=–, No. of Contacts=4, No. of Poles=2, No. of Rows=1, No. of Ways=2, Pitch Spacing=4.2mm, Series=Mini-FitJr, SVHC=–, Termination Method=Solder
K1: "General Purpose Relay SPDT (1 Form C) 12VDC Coil Through Hole", Package=None, Availability="In Stock", Check_prices=https://www.snapeda.com/parts/J115F11C12VDCSH.9/CIT+Relay+%2526+Switch/view-part/?ref=eda, MF="CIT Relay and Switch", MP=J115F11C12VDCSH.9, Price=None, Purchase-URL=https://pricing.snapeda.com/search/part/J115F11C12VDCSH.9/?ref=eda, SnapEDA_Link=https://www.snapeda.com/parts/J115F11C12VDCSH.9/CIT+Relay+%2526+Switch/view-part/?ref=snap
L1 L2 L3 L4: Supplier Part Number 1=A32700-40-ND, Supplier 1=Digi-Key, Supplier 2=Digi-Key, Supplier Part Number 2=A32700-06-ND
"Latching Delay1": library part CMP-00287-47198074-1, "ALQ3F12 ALQ Series SPST 10 A 12 V PC Pin Through Hole Class F Insulation Power Relay", Ambient Temperature Range High=85°C, Coil Current=16.7mA, Coil Power=200mW, Coil Resistance=720Ω, Coil Voltage (DC)=12V, Contact Current Rating=10A, Min Operating Temperature=-40°C, Coil Type=Non-Latching, Contact Material=Silver, Current Rating=10A, Height=16.4mm, Lead Free="Lead Free", Max Operating Temperature=85°C, Mount="Through Hole", NexarPartId=47198074, Number Of Contacts=1, Operate Time=20ms, Relay Type="General Purpose", Release Time=20ms, RoHS=Compliant, Switching Current=10A, Termination="PC Pin", Throw Configuration=SPST
LD2: library part "LOAD DRIVER - VND5E050JTR-E", Supplier Part Number 1=497-11700-1-ND, Supplier 1=Digi-Key
LD4: library part CMP-1095-00109-1, "Smart High-Side Power Switch PROFET, 12 mOhm, 1 Channel, 8.5 A Load Current, -40 to 150 degC, PG-TO252-5-11, Reel, Green", Load Current (typ)="8.5 A", Manufacturer=Infineon, Recommended Operating Voltage Max.="24 V", Recommended Operating Voltage Min.="5.5 V", Channels=1, ComponentLink1Description="Manufacturer URL", ComponentLink1URL=http://www.infineon.com/, ComponentLink2Description=Datasheet, ComponentLink2URL=http://www.infineon.com/dgdl/BTS6142D_DS_v11.pdf?folderId=db3a304314dca389011537739e37155f&fileId=db3a3043183a9555011860661a7d367a&location=en.Products.Automotive_ICs.Smart_High-_and_Low-Side_Switches.PROFET__-_Smart_High_Side_Switches.DATASHEET.BTS6142D_D, ComponentLink3Description="Package Specification", ComponentLink3URL=http://www.infineon.com/dgdl/TLE7276-Data+Sheet-+v1_11.pdf?folderId=db3a304412b407950112b408e8c90004&fileId=db3a304412b407950112b436c53f66c8&sId=db3a30433db6f09f013dc0e43c0428c1, DatasheetVersion="Rev. 1.1", Green=TRUE, Group="Automotive Qualified", Halogen-free=TRUE, Mounting Technology="Surface Mount", PackageDescription="5-Pin Plastic (Green) Transistor Single Outline Package, 6.5 x 6.12 mm Body, 1.14 mm Pitch", PackageReference=PG-TO252-5-11, PackageVersion=Nov-10, Packing=Reel, PartNumber=BTS6142D, Ptot (max)="50 W", RON @ 25degreesC="12 mOhm", RON(max) @ 150degreesC="22 mOhm", toff (max)="600 us", ton (max)="600 us"
Q1: library part MOSFET-N, "N-Channel MOSFET", Current - Continuous Drain (Id) @ 25°C="50A (Tc)", Drain to Source Voltage (Vdss)=30V, Input Capacitance (Ciss) @ Vds="1900pF @ 15V", Manufacturer="Infineon Technologies", Package / Case="TO-252-3, DPak (2 Leads + Tab), SC-63", Power - Max=47W, Supplier Device Package=PG-TO252-3, Supplier Part Number 1=DMG3406L-13DICT-ND, Category="Discrete Semiconductor Products", ComponentLink1Description=http://www.infineon.com/dgdl/Infineon-IPD075N03LG-DS-v02_01-en.pdf?folderId=5546d4694909da4801490a07012f053b&fileId=db3a30431936bc4b011951d824f83aeb, ComponentLink1URL=http://www.infineon.com/dgdl/Infineon-IPD075N03LG-DS-v02_01-en.pdf?folderId=5546d4694909da4801490a07012f053b&fileId=db3a30431936bc4b011951d824f83aeb, ComponentLink2Description=http://www.semicon.toshiba.co.jp/info/docget.jsp?type=datasheet&lang=en&pid=SSM3K329R, ComponentLink2URL=http://www.semicon.toshiba.co.jp/info/docget.jsp?type=datasheet&lang=en&pid=SSM3K329R, FET Feature="Logic Level Gate", FET Type="MOSFET N-Channel, Metal Oxide", Gate Charge (Qg) @ Vgs="18nC @ 10V", LatestRevisionDate=17-Jul-2002, LatestRevisionNote="Re-released for DXP Platform.", Mounting Type="Surface Mount", PackageDescription="TO, Flat Index; 3 In-Line, Axial Leads; Body Dia. 4.6mm; Lead Dia. 0.5 mm (max)", PackageReference=E3, PackageVersion=1995/1996, Packaging="Cut Tape (CT)", Published=8-Jun-2000, Publisher="Altium Limited", Rds On (Max) @ Id, Vgs="7.5 mOhm @ 30A, 10V", RoHS="RoHS Compliant", Supplier 1=Digi-Key, Vgs(th) (Max) @ Id="2.2V @ 250µA"
Q2 Q5: library part MOSFET-N, "N-Channel MOSFET", Current - Continuous Drain (Id) @ 25°C="50A (Tc)", Drain to Source Voltage (Vdss)=30V, Input Capacitance (Ciss) @ Vds="1900pF @ 15V", Manufacturer="Infineon Technologies", Manufacturer Part Number="IPD075N03L G", Package / Case="TO-252-3, DPak (2 Leads + Tab), SC-63", Power - Max=47W, Supplier Device Package=PG-TO252-3, Supplier Part Number 1=DMG3406L-13DICT-ND, Category="Discrete Semiconductor Products", ComponentLink1Description=http://www.infineon.com/dgdl/Infineon-IPD075N03LG-DS-v02_01-en.pdf?folderId=5546d4694909da4801490a07012f053b&fileId=db3a30431936bc4b011951d824f83aeb, ComponentLink1URL=http://www.infineon.com/dgdl/Infineon-IPD075N03LG-DS-v02_01-en.pdf?folderId=5546d4694909da4801490a07012f053b&fileId=db3a30431936bc4b011951d824f83aeb, ComponentLink2Description=http://www.semicon.toshiba.co.jp/info/docget.jsp?type=datasheet&lang=en&pid=SSM3K329R, ComponentLink2URL=http://www.semicon.toshiba.co.jp/info/docget.jsp?type=datasheet&lang=en&pid=SSM3K329R, FET Feature="Logic Level Gate", FET Type="MOSFET N-Channel, Metal Oxide", Gate Charge (Qg) @ Vgs="18nC @ 10V", LatestRevisionDate=17-Jul-2002, LatestRevisionNote="Re-released for DXP Platform.", Mounting Type="Surface Mount", PackageDescription="TO, Flat Index; 3 In-Line, Axial Leads; Body Dia. 4.6mm; Lead Dia. 0.5 mm (max)", PackageReference=E3, PackageVersion=1995/1996, Packaging="Cut Tape (CT)", Published=8-Jun-2000, Publisher="Altium Limited", Rds On (Max) @ Id, Vgs="7.5 mOhm @ 30A, 10V", RoHS="RoHS Compliant", Supplier 1=Digi-Key, Vgs(th) (Max) @ Id="2.2V @ 250µA"
Q3 Q4: Mfr_Name=MCC, C="Copyright (C) 2018 Accelerated Designs. All rights reserved", Copyright="Copyright (C) 2022 Ultra Librarian. All rights reserved.", Manufacturer_Part_Number=MCU80N03A-TP
Q6: "P-Channel 30V 11A _Ta_ 2.5W _Ta_ Surface Mount 8-SOIC", Package="SO-8 ON Semiconductor", Availability=Unavailable, MF="ON Semiconductor", MP=FDS6675, Price=None, SnapEDA_Link=https://www.snapeda.com/parts/FDS6675/ON%20Semiconductor/view-part/1666192/?ref=snap
Q7 Q8: library part MOSFET-N, "N-Channel MOSFET", Current - Continuous Drain (Id) @ 25°C="50A (Tc)", Drain to Source Voltage (Vdss)=30V, Input Capacitance (Ciss) @ Vds="1900pF @ 15V", Manufacturer="Infineon Technologies", Manufacturer Part Number="IPD075N03L G", Package / Case="TO-252-3, DPak (2 Leads + Tab), SC-63", Power - Max=47W, Supplier Device Package=PG-TO252-3, Supplier Part Number 1=DMG3406L-13DI-ND, Category="Discrete Semiconductor Products", ComponentLink1Description=http://www.infineon.com/dgdl/Infineon-IPD075N03LG-DS-v02_01-en.pdf?folderId=5546d4694909da4801490a07012f053b&fileId=db3a30431936bc4b011951d824f83aeb, ComponentLink1URL=http://www.infineon.com/dgdl/Infineon-IPD075N03LG-DS-v02_01-en.pdf?folderId=5546d4694909da4801490a07012f053b&fileId=db3a30431936bc4b011951d824f83aeb, ComponentLink2Description=http://www.semicon.toshiba.co.jp/info/docget.jsp?type=datasheet&lang=en&pid=SSM3K329R, ComponentLink2URL=http://www.semicon.toshiba.co.jp/info/docget.jsp?type=datasheet&lang=en&pid=SSM3K329R, FET Feature="Logic Level Gate", FET Type="MOSFET N-Channel, Metal Oxide", Gate Charge (Qg) @ Vgs="18nC @ 10V", LatestRevisionDate=17-Jul-2002, LatestRevisionNote="Re-released for DXP Platform.", Mounting Type="Surface Mount", PackageDescription="TO, Flat Index; 3 In-Line, Axial Leads; Body Dia. 4.6mm; Lead Dia. 0.5 mm (max)", PackageReference=E3, PackageVersion=1995/1996, Packaging="Cut Tape (CT)", Published=8-Jun-2000, Publisher="Altium Limited", Rds On (Max) @ Id, Vgs="7.5 mOhm @ 30A, 10V", RoHS="RoHS Compliant", Supplier 1=Digi-Key, Vgs(th) (Max) @ Id="2.2V @ 250µA"
R1: library part CMP-1591-00001-1, "0603 (1608 Metric) Chip Resistor", Case-EIA=0603, Case-Metric=1608, Supplier Part Number 1=P1.00KHCT-ND, PackageReference=RESC0603(1608), Supplier 1=Digi-Key
R2 R3 R4 R5 R6 R7 R8 R9 R10 R11 R12 R13 R14 R15 R16 R18 R48: library part CMP-1591-00001-1, "0603 (1608 Metric) Chip Resistor", Case-EIA=0603, Case-Metric=1608, Supplier Part Number 1=P560BZCT-ND, PackageReference=RESC0603(1608), Supplier 1=Digi-Key
R17: library part Res3, "Resistor", Supplier Part Number 1=696-1688-5-ND, LatestRevisionDate=29-May-2009, LatestRevisionNote="IPC-7351 Footprint Added.", PackageDescription="Chip Resistor", PackageReference=J1-0603, Published=8-Jun-2000, Publisher="Altium Limited", Supplier 1=Digi-Key
R19 R20 R21 R22 R24 R25 R26 R27 R38 R42: library part CMP-1591-00001-1, "0603 (1608 Metric) Chip Resistor", Case-EIA=0603, Case-Metric=1608, Supplier Part Number 1=311-10KGRCT-ND, PackageReference=RESC0603(1608), Supplier 1=Digi-Key
R23 R40 R41 R43 R45 R46 R47: library part CMP-1591-00001-1, "0603 (1608 Metric) Chip Resistor", Case-EIA=0603, Case-Metric=1608, PackageReference=RESC0603(1608)
  R40 R43 R45: Supplier 1=Digi-Key
R28 R29 R31: "Resistor", Manufacturer=Yageo, Manufacturer Part Number=RC0603JR-0782RL, Operating Temperature="-55°C ~ 155°C", Package / Case="0603 (1608 Metric)", Power (Watts)="0.1W, 1/10W", Resistance (Ohms)=82, Supplier Device Package=0603, Supplier Part Number 1=311-82GRCT-ND, Temperature Coefficient=±100ppm/°C, Tolerance=±5%, Category=Resistors, ComponentLink1Description=http://www.yageo.com/NewPortal/yageodocoutput?fileName=/pdf/R-Chip/PYu-RC_Group_51_RoHS_L_4.pdf, ComponentLink1URL=http://www.yageo.com/NewPortal/yageodocoutput?fileName=/pdf/R-Chip/PYu-RC_Group_51_RoHS_L_4.pdf, Composition="Thick Film", Failure Rate=-, Features="Moisture Resistant", Height - Seated (Max)="0.022\" (0.55mm)", Number of Terminations=2, Packaging="Cut Tape (CT)", Part Status=Active, Pricing 1="1=0.16, 10=0.016, 25=0.0112, 50=0.0084, 100=0.0062, 250=0.0048, 500=0.00382, 1000=0.00281 (CAD)", RoHS="RoHS Compliant", Size / Dimension="0.063\" L x 0.031\" W (1.60mm x 0.80mm)", Stock 1=72049, Supplier 1=Digi-Key
R30: "Resistor", Manufacturer=Yageo, Manufacturer Part Number=RC0603JR-07180RL, Operating Temperature="-55°C ~ 155°C", Package / Case="0603 (1608 Metric)", Power (Watts)="0.1W, 1/10W", Resistance (Ohms)=180, Supplier Device Package=0603, Supplier Part Number 1=311-180GRCT-ND, Temperature Coefficient=±100ppm/°C, Tolerance=±5%, Category=Resistors, ComponentLink1Description=http://www.yageo.com/NewPortal/yageodocoutput?fileName=/pdf/R-Chip/PYu-RC_Group_51_RoHS_L_4.pdf, ComponentLink1URL=http://www.yageo.com/NewPortal/yageodocoutput?fileName=/pdf/R-Chip/PYu-RC_Group_51_RoHS_L_4.pdf, Composition="Thick Film", Failure Rate=-, Features="Moisture Resistant", Height - Seated (Max)="0.022\" (0.55mm)", Number of Terminations=2, Packaging="Cut Tape (CT)", Part Status=Active, Pricing 1="1=0.16, 10=0.016, 25=0.0112, 50=0.0084, 100=0.0062, 250=0.0048, 500=0.00382, 1000=0.00281 (CAD)", RoHS="RoHS Compliant", Size / Dimension="0.063\" L x 0.031\" W (1.60mm x 0.80mm)", Stock 1=201936, Supplier 1=Digi-Key
R32 R33 R34 R36 R37 R44: library part CMP-1591-00001-1, "0603 (1608 Metric) Chip Resistor", Case-EIA=0603, Case-Metric=1608, Supplier Part Number 1=P430BZCT-ND, PackageReference=RESC0603(1608), Supplier 1=Digi-Key
R35: library part CMP-00030-78727543-1, "WSHP28182L000FEB Res Metal Strip 2818 0.002 Ohm 1% 10W ±200ppm/C Pad SMD Automotive T/R", Case/Package=2818, Max Operating Temperature=170°C, Min Operating Temperature=-65°C, Power Rating=10W, Resistance=2mΩ, Temperature Coefficient=200ppm/°C, Tolerance=1%, Composition="Metal Element", Height=3.43mm, NexarPartId=78727543, Packaging="Cut Tape", RoHS=Non-Compliant, Schedule B="8533210045, 8533210045"
R39 R49 R52: "RES SMD 10K OHM 5% 1/4W 0603", Manufacturer="Rohm Semiconductor", Manufacturer Part Number=ESR03EZPJ103, Operating Temperature="-55°C ~ 155°C", Package / Case="0603 (1608 Metric)", Power (Watts)="0.25W, 1/4W", Resistance (Ohms)=10k, Supplier Device Package=0603, Supplier Part Number 1=RHM10KDCT-ND, Temperature Coefficient=±200ppm/°C, Tolerance=±5%, Category=Resistors, ComponentLink1Description=http://rohmfs.rohm.com/en/products/databook/datasheet/passive/resistor/chip_resistor/esr.pdf, ComponentLink1URL=http://rohmfs.rohm.com/en/products/databook/datasheet/passive/resistor/chip_resistor/esr.pdf, Composition="Thick Film", Failure Rate=-, Features="Automotive AEC-Q200, Pulse Withstanding", Height - Seated (Max)="0.022\" (0.55mm)", LatestRevisionDate=17-Jul-2002, LatestRevisionNote="Re-released for DXP Platform.", PackageDescription="Axial Device, Thru-Hole; 2 Leads; 0.3 in Pin Spacing", PackageReference=AXIAL-0.3, Packaging="Cut Tape (CT)", Part Status=Active, Pricing 1="1=0.15, 10=0.119, 25=0.0824, 50=0.0642, 100=0.0458, 250=0.03568, 500=0.02836, 1000=0.02012 (CAD)", Published=8-Jun-2000, Publisher="Altium Limited", RoHS="RoHS Compliant", Size / Dimension="0.063\" L x 0.031\" W (1.60mm x 0.80mm)", Stock 1=0, Supplier 1=Digi-Key
R50 R54: "RES SMD 100 OHM 5% 1/4W 0603", Manufacturer="Rohm Semiconductor", Manufacturer Part Number=ESR03EZPJ101, Operating Temperature="-55°C ~ 155°C", Package / Case="0603 (1608 Metric)", Power (Watts)="0.25W, 1/4W", Resistance (Ohms)=100, Supplier Device Package=0603, Supplier Part Number 1=RHM100DCT-ND, Temperature Coefficient=±200ppm/°C, Tolerance=±5%, Category=Resistors, ComponentLink1Description=http://rohmfs.rohm.com/en/products/databook/datasheet/passive/resistor/chip_resistor/esr.pdf, ComponentLink1URL=http://rohmfs.rohm.com/en/products/databook/datasheet/passive/resistor/chip_resistor/esr.pdf, Composition="Thick Film", Failure Rate=-, Features="Automotive AEC-Q200, Pulse Withstanding", Height - Seated (Max)="0.022\" (0.55mm)", LatestRevisionDate=17-Jul-2002, LatestRevisionNote="Re-released for DXP Platform.", PackageDescription="Axial Device, Thru-Hole; 2 Leads; 0.3 in Pin Spacing", PackageReference=AXIAL-0.3, Packaging="Cut Tape (CT)", Part Status=Active, Pricing 1="1=0.15, 10=0.119, 25=0.0824, 50=0.0642, 100=0.0458, 250=0.03568, 500=0.02836, 1000=0.02012 (CAD)", Published=8-Jun-2000, Publisher="Altium Limited", RoHS="RoHS Compliant", Size / Dimension="0.063\" L x 0.031\" W (1.60mm x 0.80mm)", Stock 1=57430, Supplier 1=Digi-Key
R51: library part Res1, "RES SMD 10K OHM 5% 1/4W 0603", Manufacturer="Rohm Semiconductor", Manufacturer Part Number=ESR03EZPJ103, Operating Temperature="-55°C ~ 155°C", Package / Case="0603 (1608 Metric)", Power (Watts)="0.25W, 1/4W", Resistance (Ohms)=10k, Supplier Device Package=0603, Supplier Part Number 1=RHM10KDCT-ND, Temperature Coefficient=±200ppm/°C, Tolerance=±5%, Category=Resistors, ComponentLink1Description=http://rohmfs.rohm.com/en/products/databook/datasheet/passive/resistor/chip_resistor/esr.pdf, ComponentLink1URL=http://rohmfs.rohm.com/en/products/databook/datasheet/passive/resistor/chip_resistor/esr.pdf, Composition="Thick Film", Failure Rate=-, Features="Automotive AEC-Q200, Pulse Withstanding", Height - Seated (Max)="0.022\" (0.55mm)", LatestRevisionDate=17-Jul-2002, LatestRevisionNote="Re-released for DXP Platform.", PackageDescription="Axial Device, Thru-Hole; 2 Leads; 0.3 in Pin Spacing", PackageReference=AXIAL-0.3, Packaging="Cut Tape (CT)", Part Status=Active, Pricing 1="1=0.15, 10=0.119, 25=0.0824, 50=0.0642, 100=0.0458, 250=0.03568, 500=0.02836, 1000=0.02012 (CAD)", Published=8-Jun-2000, Publisher="Altium Limited", RoHS="RoHS Compliant", Size / Dimension="0.063\" L x 0.031\" W (1.60mm x 0.80mm)", Stock 1=0, Supplier 1=Digi-Key
R53: "RES SMD 33K OHM 5% 1/4W 0603", Manufacturer="Rohm Semiconductor", Manufacturer Part Number=ESR03EZPJ333, Operating Temperature="-55°C ~ 155°C", Package / Case="0603 (1608 Metric)", Power (Watts)="0.25W, 1/4W", Resistance (Ohms)=33k, Supplier Device Package=0603, Supplier Part Number 1=RHM33KDCT-ND, Temperature Coefficient=±200ppm/°C, Tolerance=±5%, Category=Resistors, ComponentLink1Description=http://rohmfs.rohm.com/en/products/databook/datasheet/passive/resistor/chip_resistor/esr.pdf, ComponentLink1URL=http://rohmfs.rohm.com/en/products/databook/datasheet/passive/resistor/chip_resistor/esr.pdf, Composition="Thick Film", Failure Rate=-, Features="Automotive AEC-Q200, Pulse Withstanding", Height - Seated (Max)="0.022\" (0.55mm)", LatestRevisionDate=17-Jul-2002, LatestRevisionNote="Re-released for DXP Platform.", PackageDescription="Axial Device, Thru-Hole; 2 Leads; 0.3 in Pin Spacing", PackageReference=AXIAL-0.3, Packaging="Cut Tape (CT)", Part Status=Active, Pricing 1="1=0.15, 10=0.119, 25=0.0824, 50=0.0642, 100=0.0458, 250=0.03568, 500=0.02836, 1000=0.02012 (CAD)", Published=8-Jun-2000, Publisher="Altium Limited", RoHS="RoHS Compliant", Size / Dimension="0.063\" L x 0.031\" W (1.60mm x 0.80mm)", Stock 1=5269, Supplier 1=Digi-Key
U1: "Voltage Regulator", Supplier Part Number 1=811-3014-ND, LatestRevisionDate=29-May-2009, LatestRevisionNote="IPC-7351 Footprint Added.", PackageDescription="3-Pin Transistor Outline Package 2.54 mm Pitch, 15.1 mm Lead Span", PackageReference=D2PAK, Published=24-Mar-1999, Publisher="Altium Limited", Supplier 1=Digi-Key, Supplier 2=Digi-Key
U2: "Voltage Regulator", Supplier Part Number 1=811-2692-ND, LatestRevisionDate=29-May-2009, LatestRevisionNote="IPC-7351 Footprint Added.", PackageDescription="3-Pin Transistor Outline Package 2.54 mm Pitch, 15.1 mm Lead Span", PackageReference=D2PAK, Published=24-Mar-1999, Publisher="Altium Limited", Supplier 1=Digi-Key, Supplier 2=Digi-Key
U4 U6: library part CMP-1685-00007-1, "Precision Timer, 4.5 to 16 V, 0 to 70 degC, 8-Pin SOIC (D8), Green (RoHS & no Sb/Br), Tape and Reel", Case\Package=SMA, Forward Current="1 A", Forward Voltage="450 mV", Max Operating Temperature="125 degC", Max Surge Current="30 A", Min Operating Temperature="-55 degC", Package Quantity=1, Peak Reverse Current="500 uA", Supplier Part Number 1=296-6501-1-ND, Code_JEDEC=MS-012, ComponentLink1Description="Manufacturer URL", ComponentLink1URL=http://www.ti.com/, ComponentLink2Description=Datasheet, ComponentLink2URL=http://www.ti.com/general/docs/lit/getliterature.tsp?genericPartNumber=NE555&fileType=pdf, ComponentLink3Description="Package Specification", ComponentLink3URL=http://www.ti.com/lit/ml/msoi002j/msoi002j.pdf, DatasheetVersion="SLFS022I, 09/2014", Height="2.44 mm", Length="4.57 mm", Mount="Surface Mount", PackageDescription="8-Pin Small Outline Integrated Circuit, Body 4.9 x 3.9 mm, Pitch 1.27 mm", PackageReference=D0008A, PackageVersion="4040047-3/M, 06/2011", Packaging="Cut Tape", Pins=2, Radiation Hardening=No, REACH SVHC=Unknown, RoHSCompliant=true, Supplier 1=Digi-Key, Width="2.84 mm"
U5: library part CMP-0474-00861-1, "UV, OV and Reverse Supply Protection Controller, 2.5 to 34 V Vin, 8-pin SOT23 (TS8-8), -40 to 85 degC, Pb-Free, Mini Tape and Reel", Extended Temp="C, I, H", Manufacturer="Linear Technology", Power Good=no, Supplier Part Number 1=LTC4365ITS8#TRMPBFCT-ND, Active Limiting=no, Circuit Breakers(#)=1, Code_JEDEC=MO-193, ComponentLink1Description="Manufacturer URL", ComponentLink1URL=http://www.linear.com/, ComponentLink2Description=Datasheet, ComponentLink2URL=http://cds.linear.com/docs/en/datasheet/4365f.pdf, ComponentLink3Description="Package Specification", ComponentLink3URL=http://cds.linear.com/docs/en/packaging/SOT_8_05-08-1637.pdf, Fast Comparator=no, Fault=yes, Foldback=no, Mounting Technology="Surface Mount", PackageDescription="8-Pin Plastic TSOT-23, Body 2.9 x 1.63 mm, Pitch 0.65 mm", PackageReference=TS8-8, PackageVersion="Rev. A, 08/2010", Packing="Mini Tape and Reel", PartNumber=LTC4365ITS8#TRMPBF, Reset=no, RoHS=TRUE, Supplier 1=Digi-Key, Vin Range="2.5 to 34 V"
WM1: library part "Header 2", "Header, 2-Pin", Supplier Part Number 1=WM11908-ND, LatestRevisionDate=17-Jul-2002, LatestRevisionNote="Re-released for DXP Platform.", Publisher="Altium Limited", Supplier 1=Digi-Key

## Via types
v1: diameter 31, hole 17, Top Layer to Bottom Layer, 1578 vias
v2: diameter 50, hole 28, Top Layer to Bottom Layer, 24 vias
v3: diameter 30, hole 15, Top Layer to Bottom Layer, 3 vias
v4: diameter 170, hole 128, Top Layer to Bottom Layer, 2 vias
v5: diameter 250, hole 137, Top Layer to Bottom Layer, 2 vias
v6: diameter 60, hole 34, Top Layer to Bottom Layer, 1 vias

## Nets (pads, with @x,y where several pads share a name; then routed paths per layer and width w, separated by ;. In a path a pad name is that pad's centre, name@x,y a point inside that pad or via, vN(x,y) a via of type N, cw(c..) or ccw(c..) an arc to the next point about the centre after c; other vN are vias at no path point)
3V3: C12.2 C16.1 CN1.35 CON1.A11 CON1.B1 CON2.A4 CON2.B10 R28.1 R29.2 R32.2 R33.2 U1.3 U3.5 | length 10278.1
  Top Layer w15: 1753.5,1443.05 1753.5,1468 1770.49,1485 U3.5@1791,1485
  Top Layer w20: CON2.A4@889,3390 807.5,3308.5 807.5,3058.02 860.53,3005 1190.95,3005 v1(1513.2,2682.75) ; CON2.B10@989,3990 941.88,4037.12 875.25,4037.12 841.88,4070.48 841.88,4527.51 872.37,4558 929,4558 967,4596 v1(1022,4596) ; C16.1@1632.68,1491 1681.38,1491 1729.34,1443.05 1753.5,1443.05 2158.23,1443.05 2192.78,1477.6 2192.78,1487.2 R32.2@2196.56,1491 2196.57,1505.1 2201,1509.53 2199.28,1511.25 2199.28,1635.28 v3(2201,1637) ; R28.1@1749,2446.44 1750.28,2447.72 C12.2@1959.72,2447.72 ; C12.2@1961,2449 C12.2@1959.72,2447.72 ; CN1.35@2351.54,1964.38 2281.23,2034.69 2031.78,2034.69 2002,2064.46 2002,2140 U1.3@1931,2211 1931,2219.43 1959.72,2248.15 C12.2@1959.72,2447.72 ; v1(3462.4,3435) v1(3462.4,3615) ; v1(3538.54,4542.81) 3538.54,4541.09 3554.04,4525.59 3554.04,4134.07 3598.1,4090 CON1.A11@3604.56,4090 ; v1(3543.3,3771.03) 3551.08,4019.89 3592.84,4078.28 CON1.A11@3604.56,4090 ; CON1.A11@3618.02,4090 CON1.A11@3604.56,4090 ; v1(3632.58,3016.36) 3634.68,3018.47 3646.48,3018.47 CON1.B1@3718.02,3090